# Altium PCB MOD_DRV.PcbDoc (part 1 of 2)
Units mm, origin at the board's own origin, x right, y up, seen from the top; angles counter-clockwise.
Board outline 63.5 x 51.43 mm, 2 copper layers (Top Layer, Bottom Layer); 88 components, 70 nets, 353 pads, 143 vias.
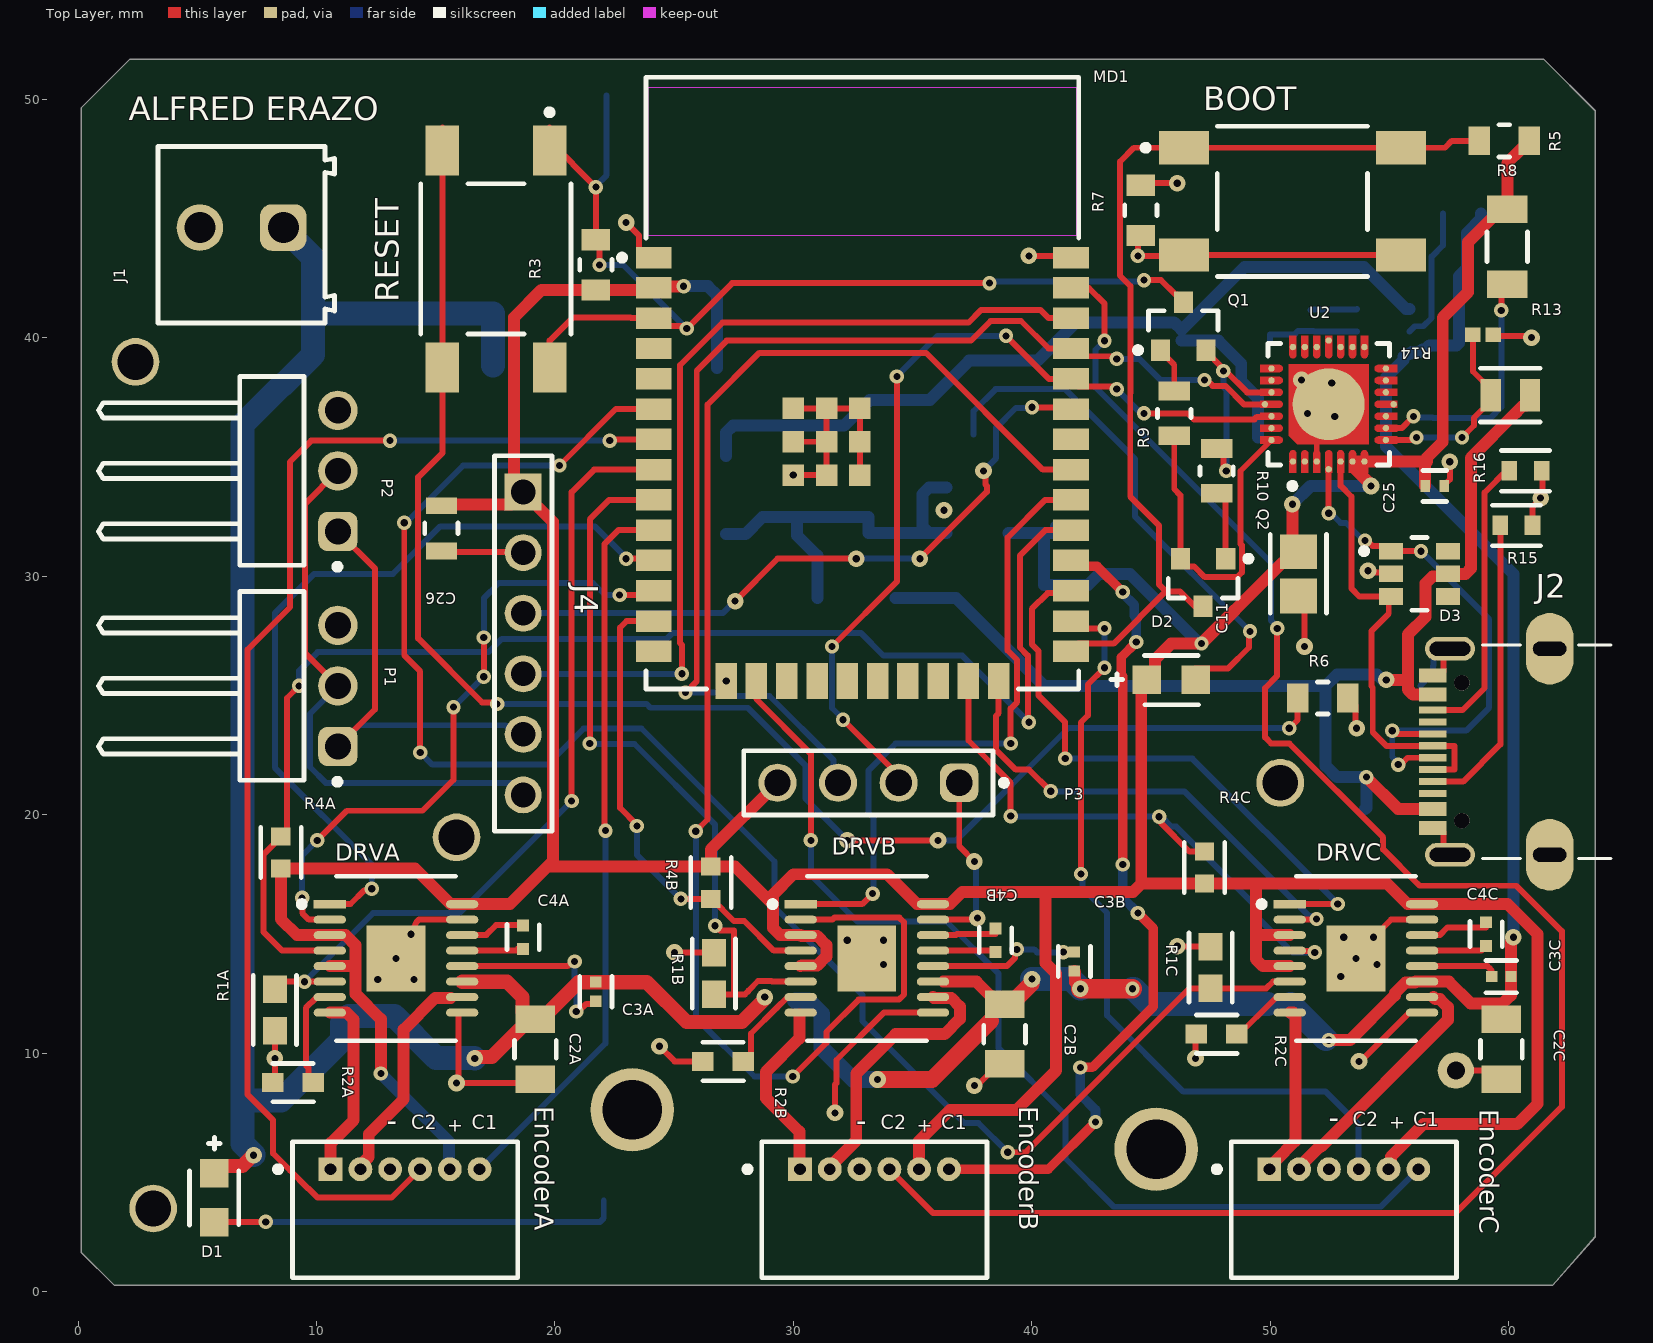
[diagram p0: Top Layer view]
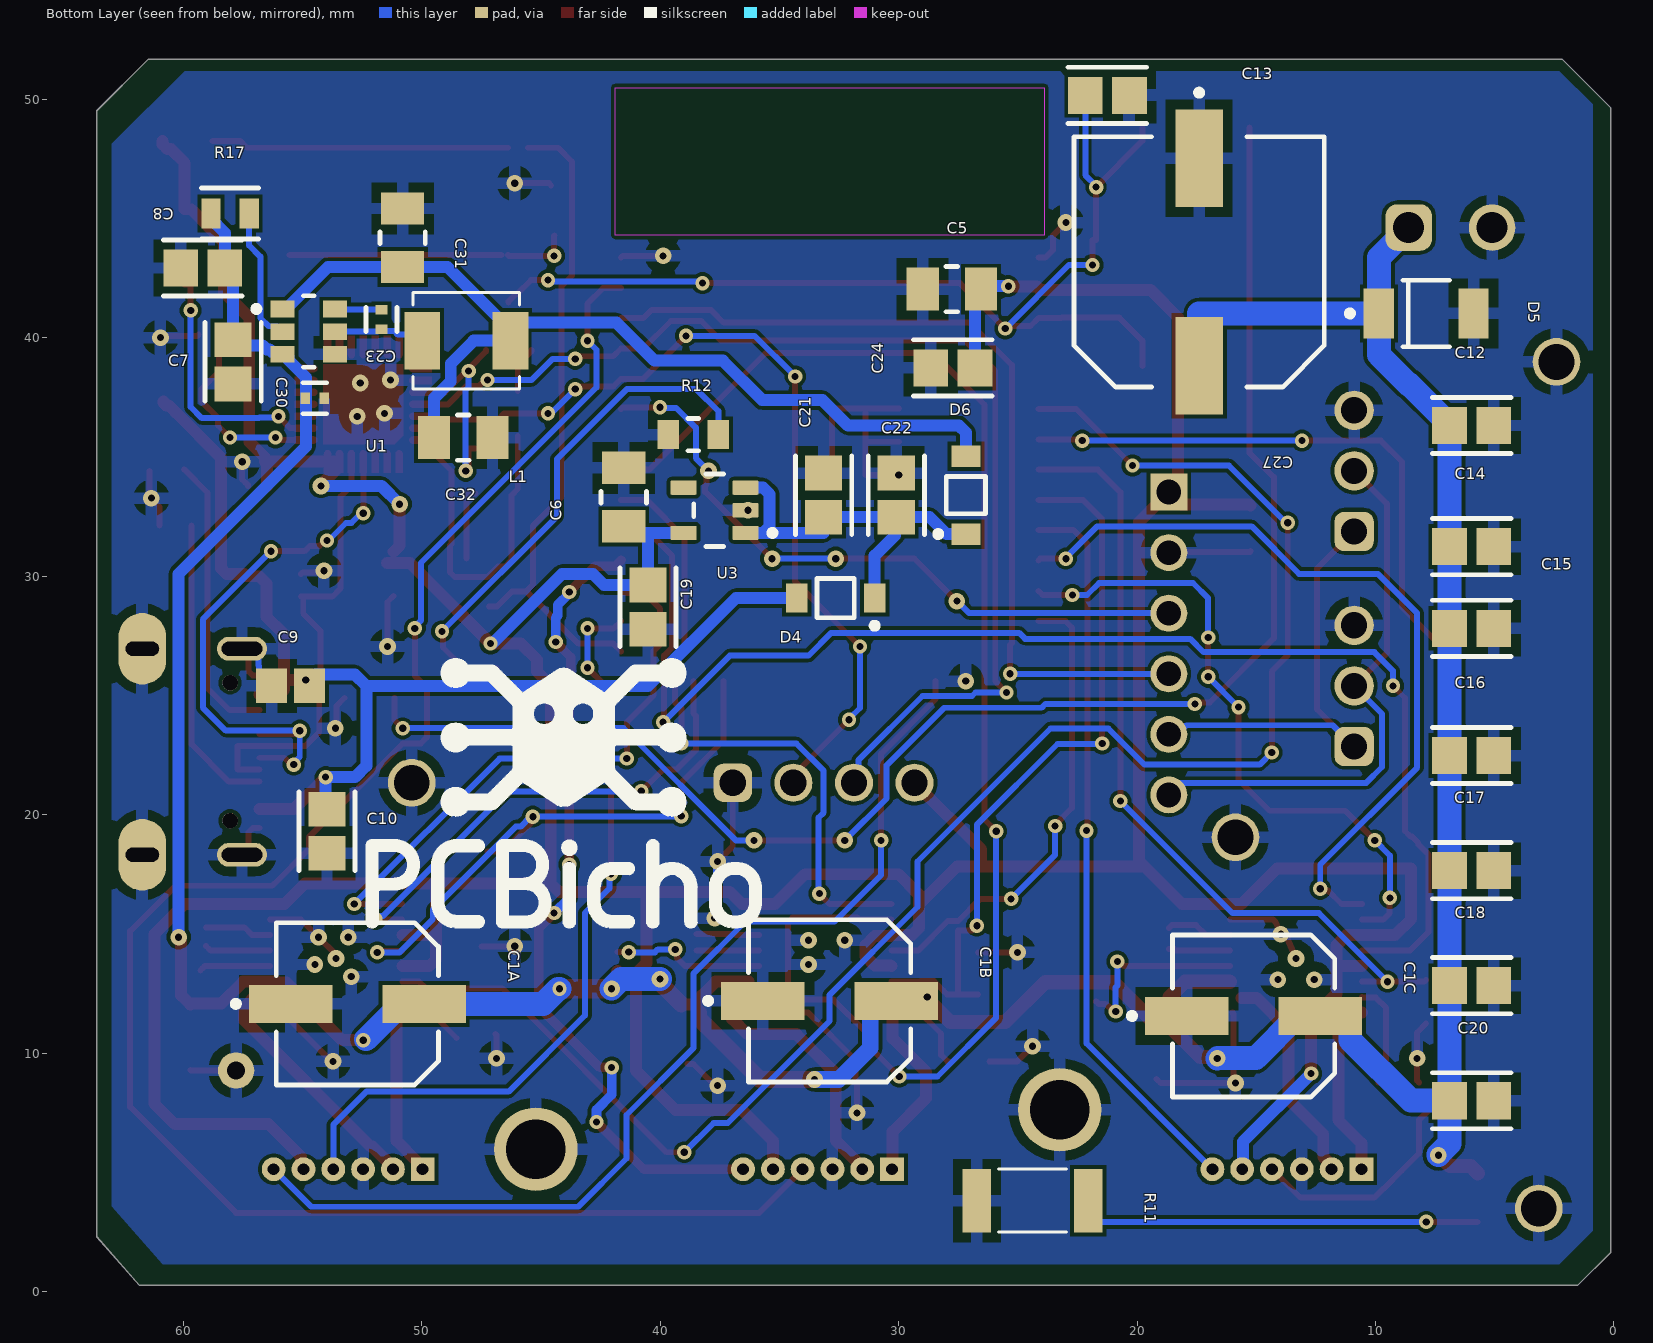
[diagram p1: Bottom Layer view, seen from below]
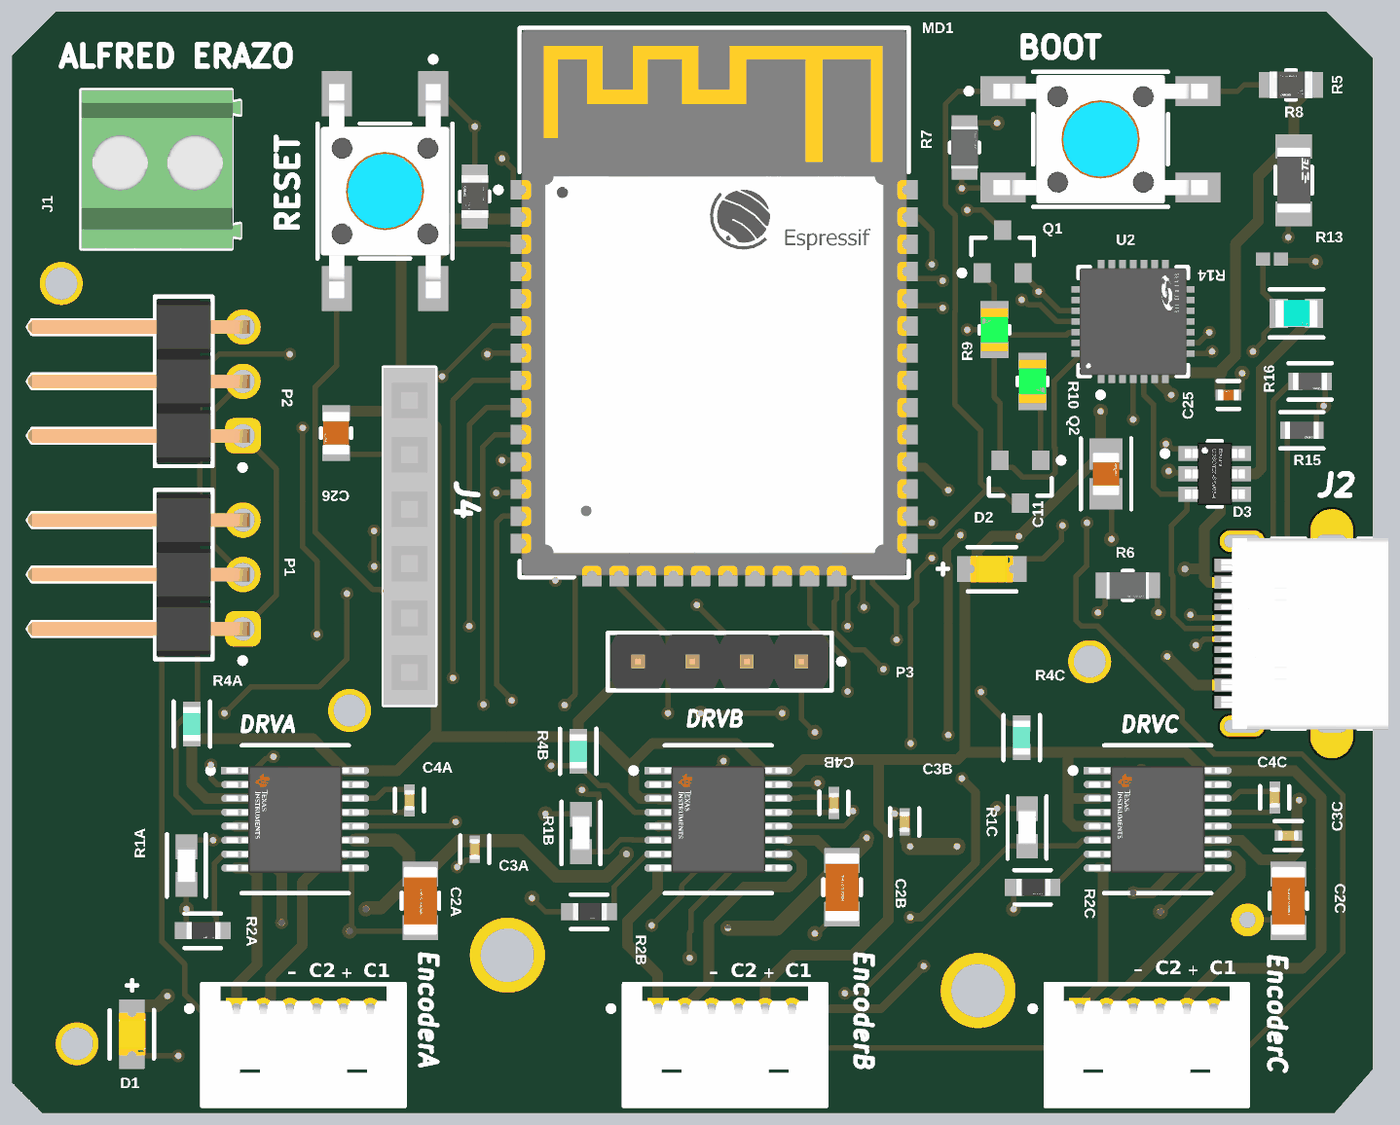
[diagram p3: 3D render of the assembled board from above, using the file's embedded part models]
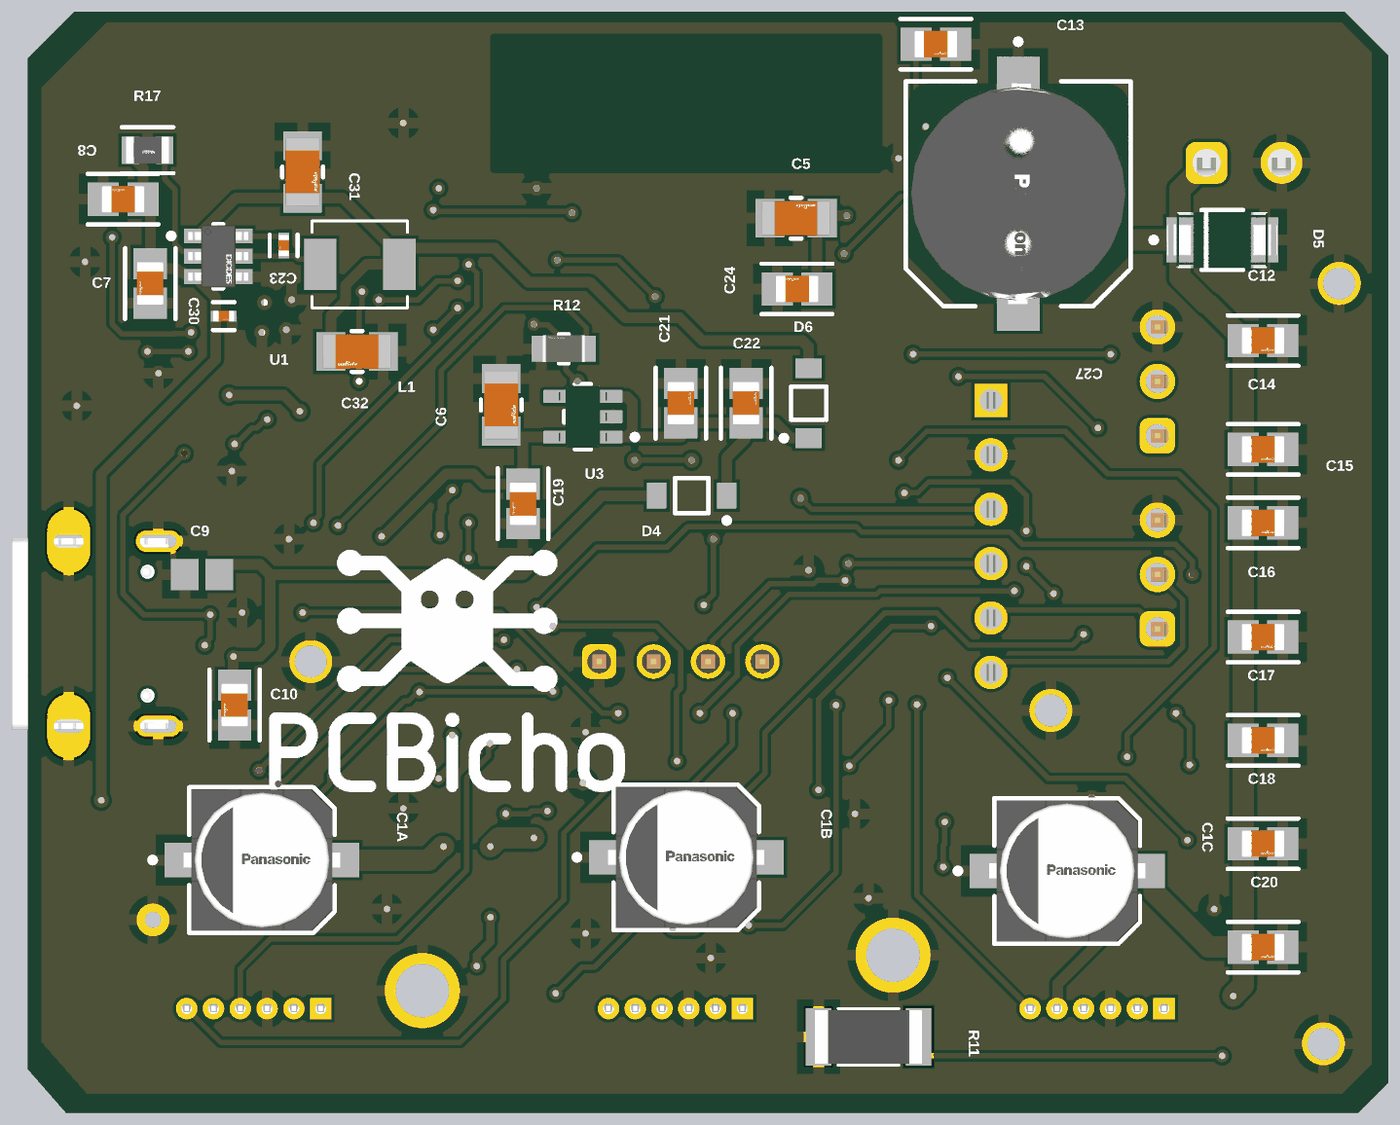
[diagram p4: 3D render of the assembled board from below, using the file's embedded part models]

## Layer stack, top to bottom
Top Solder: solder mask 0.0102, Solder Resist, Dk 3.5
Top Layer: signal copper 0.0356
Dielectric 1: dielectric 0.32, FR-4, Dk 4.8
Bottom Layer: signal copper 0.0356
Bottom Solder: solder mask 0.0102, Solder Resist, Dk 3.5

## Board outline
1.524,0.254 0.127,1.651 0.127,49.632 2.184,51.689 61.457,51.689 63.627,49.519 63.627,2.301 61.834,0.254
board region "Default Layer Stack Region": 1.524,0.254 0.127,1.651 0.127,49.632 2.184,51.689 61.457,51.689 63.627,49.519 63.627,2.301 61.834,0.254
board region "Default Layer Stack Region": 1.524,0.254 0.127,1.651 0.127,49.632 2.184,51.689 61.457,51.689 63.627,49.519 63.627,2.301 61.834,0.254
board region "Layer Stack Region 1": 1.524,0.254 0.127,1.651 0.127,49.632 2.184,51.689 61.457,51.689 63.627,49.519 63.627,2.301 61.834,0.254

## Design rules (kind name [scope] priority, off if disabled: settings)
Clearance [All] p1: gap=0.15 ignorepadtopadclearanceinfootprint=FALSE
MinimumSolderMaskSliver [All] p1: minsoldermaskwidth=0.1
PlaneConnect [All] p1: planeconnectstyle=Relief reliefexpansion=0.508 reliefentries=4 reliefconductorwidth=0.5 reliefairgap=0.254
PolygonConnect [All] p1: connectstyle=Relief reliefconductorwidth=0.5 reliefentries=4 polygonreliefangle="90 Angle" airgapwidth=0.4
RoutingVias [All] p1: holewidth=0.3 width=0.6 viastyle="Through Hole" minholewidth=0.3 minwidth=0.6 maxholewidth=0.3 maxwidth=0.6
SilkToSilkClearance [All] p1: silktosilkclearance=0.15
SilkToSolderMaskClearance [IsPad] p1: minsilkscreentomaskgap=0.1 clearancetoexposedcopper=TRUE
SolderMaskExpansion SolderMask_Vias [IsVia] p1: expansion=0 istentingtop=TRUE
SolderMaskExpansion [All] p2: expansion=0 istentingtop=FALSE
SupplyNets "Schematic Supply Nets_4" [InNet('3V3')] p1: voltage=0.000
SupplyNets "Schematic Supply Nets_3" [InNet('VBUS')] p2: voltage=0.000
SupplyNets "Schematic Supply Nets_2" [InNet('+5')] p3: voltage=0.000
SupplyNets "Schematic Supply Nets_1" [InNet('V_MOT')] p4: voltage=0.000
SupplyNets "Schematic Supply Nets" [InNet('GND')] p5: voltage=0.000
Width Width_VMOT [InNetClass('VMOT')] p1: maxlimit=3 minlimit=0.4 preferedwidth=2
Width Width_MOTOR [InNetClass('MOTOR')] p2: maxlimit=1 minlimit=0.5 preferedwidth=0.5
Width Width_PWR_LOG [InNetClass('PWR_LOG')] p3: maxlimit=1 minlimit=0.4 preferedwidth=0.5
Width [All] p4: maxlimit=0.5 minlimit=0.2 preferedwidth=0.25
26 further rules are at their usual default settings.

## Classes and differential pairs
net class PWR_LOG: 3V3 5V_sys +5 VBUS
net class MOTOR: NetDRVA_8 NetDRVA_10 NetDRVB_8 NetDRVB_10 NetDRVC_8 NetDRVC_10
net class VMOT: V_MOT
channel class DRV8876: DRV_1 DRV_2 DRV_3
component class U_PowerSupply: C7 C8 C12 C14 C15 C16 C17 C18 C19 C20 C21 C22 C23 C24 C27 C30 C31 C32 D2 D4 D5 D6 L1 R11 R17 U1 U3
component class U_ESP32_module: BOOT C5 C6 C9 C10 C11 C13 C25 D3 J2 MD1 P3 Q1 Q2 R3 R5 R6 R7 R8 R9 R10 R13 R14 R15 R16 RESET U2
component class U_CAN: C26 J4 P1 P2
component class DRV_3: C1C C2C C3C C4C DRVC EncoderC R1C R2C R4C
component class DRV_2: C1B C2B C3B C4B DRVB EncoderB R1B R2B R4B
component class DRV_1: C1A C2A C3A C4A DRVA EncoderA R1A R2A R4A

## Components (designator, comment, footprint, x,y, rotation, side; value= is the part's Value field where it differs from the comment)
BOOT "1977223-1" FP-1977223-1-MFG 50.927,45.72 r180 top (schematic designator SW2)
C1A "50SVPK22M" FP-OS-CON-SMT-C6-MFG 52.699,12.065 r180 bottom (schematic designator C1)
C1B "50SVPK22M" FP-OS-CON-SMT-C6-MFG 32.893,12.192 r180 bottom (schematic designator C1)
C1C "50SVPK22M" FP-OS-CON-SMT-C6-MFG 15.113,11.557 r180 bottom (schematic designator C1)
C2A "TMK316SD104KL-T" FP-1206-L_3_2_0_15-W_1_6-IPC_C 19.177,10.16 r270 top (schematic designator C2)
C2B "TMK316SD104KL-T" FP-1206-L_3_2_0_15-W_1_6-IPC_C 38.862,10.795 r270 top (schematic designator C2)
C2C "TMK316SD104KL-T" FP-1206-L_3_2_0_15-W_1_6-IPC_C 59.69,10.16 r270 top (schematic designator C2)
C3A "CC0402MRX5R7BB104" FP-CC0402-IPC_C 21.717,12.573 r270 top value="100 nF" (schematic designator C3)
C3B "CC0402MRX5R7BB104" FP-CC0402-IPC_C 41.783,13.843 r90 top value="100 nF" (schematic designator C3)
C3C "CC0402MRX5R7BB104" FP-CC0402-IPC_C 59.69,13.208 r180 top value="100 nF" (schematic designator C3)
C4A "CC0402KRX5R8BB223" FP-CC0402-MFG 18.669,14.859 r270 top value="22 nF" (schematic designator C4)
C4B "CC0402KRX5R8BB223" FP-CC0402-MFG 38.481,14.732 r270 top value="22 nF" (schematic designator C4)
C4C "CC0402KRX5R8BB223" FP-CC0402-MFG 59.055,14.986 r270 top value="22 nF" (schematic designator C4)
C5 "GRM31CR61E476ME44L" FP-GRM31C-0_3-IPC_C 27.768,42.037 r0 bottom
C6 "GRM31CR61E476ME44L" FP-GRM31C-0_3-IPC_C 41.529,33.319 r90 bottom
C7 "GRM21BZ7YA475KE15K" FP-GRM21B-0_2-e0_2_0_7-IPC_A 57.912,38.989 r270 bottom
C8 "GRM21BZ7YA475KE15K" FP-GRM21B-0_2-e0_2_0_7-IPC_A 59.182,42.926 r0 bottom
C9 "100nF" CAPC2013X145X50NL20T25 55.499,25.4 r180 bottom
C10 "GRM21BZ7YA475KE15K" FP-GRM21B-0_2-e0_2_0_7-IPC_A 53.975,19.304 r270 bottom
C11 "GRM21BZ7YA475KE15K" FP-GRM21B-0_2-e0_2_0_7-IPC_A 51.181,30.099 r90 top
C12 "GRM21BZ7YA475KE15K" FP-GRM21B-0_2-e0_2_0_7-IPC_A 5.969,36.322 r180 bottom
C13 "GRM21BZ7YA475KE15K" FP-GRM21B-0_2-e0_2_0_7-IPC_A 21.246,50.165 r180 bottom
C14 "GRM21BZ7YA475KE15K" FP-GRM21B-0_2-e0_2_0_7-IPC_A 5.969,31.242 r180 bottom
C15 "GRM21BZ7YA475KE15K" FP-GRM21B-0_2-e0_2_0_7-IPC_A 5.969,27.813 r180 bottom
C16 "GRM21BZ7YA475KE15K" FP-GRM21B-0_2-e0_2_0_7-IPC_A 5.969,22.479 r180 bottom
C17 "GRM21BZ7YA475KE15K" FP-GRM21B-0_2-e0_2_0_7-IPC_A 5.969,17.653 r180 bottom
C18 "GRM21BZ7YA475KE15K" FP-GRM21B-0_2-e0_2_0_7-IPC_A 5.969,12.827 r180 bottom
C19 "GRM21BZ7YA475KE15K" FP-GRM21B-0_2-e0_2_0_7-IPC_A 40.513,28.702 r270 bottom
C20 "GRM21BZ7YA475KE15K" FP-GRM21B-0_2-e0_2_0_7-IPC_A 5.969,8.001 r180 bottom
C21 "GRM21BZ7YA475KE15K" FP-GRM21B-0_2-e0_2_0_7-IPC_A 33.147,33.401 r90 bottom
C22 "GRM21BZ7YA475KE15K" FP-GRM21B-0_2-e0_2_0_7-IPC_A 30.099,33.401 r90 bottom
C23 "GRM155R71H104KE14D" FP-GRM155-0_05-MFG 51.689,40.767 r270 bottom
C24 "GRM21BZ7YA475KE15K" FP-GRM21B-0_2-e0_2_0_7-IPC_A 27.723,38.735 r0 bottom
C25 "GRM155R71H104KE14D" FP-GRM155-0_05-MFG 56.896,33.782 r180 top
C26 "GCD21BR72A104MA01L" FP-GCD21B-0_15-MFG 15.24,32.004 r270 top
C27 "EEH-ZA1V221P" FP-ZAG-MFG 17.399,43.18 r270 bottom value=220uF
C30 "GRM155R71H104KE14D" FP-GRM155-0_05-MFG 54.483,37.465 r180 bottom
C31 "GRM31CR61E476ME44L" FP-GRM31C-0_3-IPC_C 50.8,44.196 r90 bottom
C32 "GRM31CR61E476ME44L" FP-GRM31C-0_3-IPC_C 48.26,35.814 r180 bottom
D1 "SM0805YCL" FP-SM0805YCL-MFG 5.715,3.937 r270 top
D2 "SM0805YCL" FP-SM0805YCL-MFG 45.847,25.654 r0 top
D3 "CDSOT23-SRV05-4" FP-CDSOT23-SRV05-4-MFG 56.261,30.099 r0 top
D4 "MBR120VLSFT1G" ONSC-SOD-123FL-2-498-01_V 32.639,29.083 r0 bottom
D5 "SMAJ15A" FP-SMA-MFG 7.874,41.021 r180 bottom
D6 "MBR120VLSFT1G" ONSC-SOD-123FL-2-498-01_V 27.178,33.401 r90 bottom
DRVA "DRV8876PWPR" FP-PWP0016C-IPC_C 13.335,13.97 r0 top (schematic designator DRV)
DRVB "DRV8876PWPR" FP-PWP0016C-IPC_C 33.084,13.97 r0 top (schematic designator DRV)
DRVC "DRV8876PWPR" FP-PWP0016C-IPC_C 53.594,13.97 r0 top (schematic designator DRV)
EncoderA "53048-0610" FP-53048-0610-MFG 13.716,3.429 r0 top (schematic designator J3)
EncoderB "53048-0610" FP-53048-0610-MFG 33.401,3.429 r0 top (schematic designator J3)
EncoderC "53048-0610" FP-53048-0610-MFG 53.086,3.429 r0 top (schematic designator J3)
J1 "691214110002" 691214110002 6.858,44.323 r180 top
J2 "UJ20-C-H-G-SMT-2A-P16-TR" SAMESKY_UJ20-C-H-G-SMT-2A-P16-TR 61.719,22.637 r90 top
J4 "SSW-106-02-T-S" SMTC-SSW-106-02-X-S 18.669,33.528 r270 top
L1 "SRP4020TA4R7M" IND_SRP4020TA4R7M 48.133,39.878 r180 bottom value=4.7uH
MD1 "356-ESP32WRM32E132PH" FP-ESP32-WROOM-32E_4MB-MFG 32.893,38.1 r0 top
P1 "61300311021" 61300311021 8.128,25.4 r270 top
P2 "61300311021" 61300311021 8.128,34.417 r270 top
P3 "61300411121" 61300411121 33.147,21.336 r180 top
Q1 "MMBTH10LT3G" ONSC-SOT-23-3-318-08_V 46.355,40.481 r90 top
Q2 "MMBTH10LT3G" ONSC-SOT-23-3-318-08_V 47.183,29.734 r270 top
R1A "RN73R1JTTD3001F50" FP-RN73R1J-IPC_A 8.255,11.811 r90 top (schematic designator R1)
R1B "RN73R1JTTD3001F50" FP-RN73R1J-IPC_A 26.67,13.335 r270 top (schematic designator R1)
R1C "RN73R1JTTD3001F50" FP-RN73R1J-IPC_A 47.498,13.589 r270 top (schematic designator R1)
R2A "RT0603DRD0720KL" FP-RT0603-MFG 9.017,8.763 r0 top value=20KΩ (schematic designator R2)
R2B "RT0603DRD0720KL" FP-RT0603-MFG 27.051,9.652 r0 top value=20KΩ (schematic designator R2)
R2C "RT0603DRD0720KL" FP-RT0603-MFG 47.752,10.795 r0 top value=20KΩ (schematic designator R2)
R3 "RT0805FRD0710KL" FP-RT0805-MFG 21.717,43.053 r90 top value=10KΩ
R4A "RK73H1JLTDD1002F" FP-RK73H1J-IPC_C 8.509,18.415 r90 top (schematic designator R4)
R4B "RK73H1JLTDD1002F" FP-RK73H1J-IPC_C 26.543,17.145 r270 top (schematic designator R4)
R4C "RK73H1JLTDD1002F" FP-RK73H1J-IPC_C 47.244,17.78 r90 top (schematic designator R4)
R5 "RT0805FRD0710KL" FP-RT0805-MFG 59.817,48.26 r180 top value=10KΩ
R6 "AC0805FR-07470RL" FP-AC0805-MFG 52.197,24.892 r0 top value=470Ω
R7 "AC0805FR-07470RL" FP-AC0805-MFG 44.577,45.339 r90 top value=470Ω
R8 "RP73D2B1K0BTDF" FP-RP732B-MFG 59.944,43.815 r90 top value=1.0KΩ
R9 "PATT0805E1002BGT1" FP-PATT0805-MFG 45.974,36.83 r90 top value=10kΩ
R10 "PATT0805E1002BGT1" FP-PATT0805-MFG 47.752,34.417 r270 top value=10kΩ
R11 "CRCW20101K60FKEF" RESC5025X70N 24.384,3.81 r180 bottom
R12 "AC0805FR-07470RL" FP-AC0805-MFG 38.608,35.941 r0 bottom value=470Ω
R13 "RN732ATTDK2212B25" FP-RN732A-IPC_C 60.071,37.592 r0 top
R14 "47.5K" RESC1005X40X25NL10T10 58.928,40.132 r180 top
R15 "AC0603JR-075K1L" FP-AC0603-IPC_C 60.325,32.131 r0 top
R16 "AC0603JR-075K1L" FP-AC0603-IPC_C 60.706,34.417 r0 top
R17 "RC0805FR-07100KL" FP-RC0805-0_6-IPC_C 58.039,45.212 r0 bottom
RESET "1977223-1" FP-1977223-1-MFG 17.526,43.307 r90 top (schematic designator SW1)
U1 "AP63205WU-7" FP-TSOT26-MFG 54.737,40.259 r180 bottom
U2 "CP2102N-A02-GQFN28R" FP-CP2102N-A02-GQFN28R-MFG 52.451,37.211 r90 top
U3 "TLV75733PDBVR" FP-DBV0005A-MFG 37.719,32.766 r0 bottom

## Footprints (in the part's own frame and the unit in brackets; to place one, negate y for a bottom-side part, rotate by r counter-clockwise, add the part's x,y. Pads: shape width x height; smd on the part's side, far side on the other; paste and mask are expansions set on the pad)
61300311021 [mm] "Pin Header, pitch 2.54 mm, THT, Angled, single row, 3p"
  rrect50% 1.65x1.65 hole 1.1: 1(2.54,2.77)
  round 1.65 hole 1.1: 2(0,2.77) 3(-2.54,2.77)
  silkscreen extent -3.96,-7.27 4.14,2.88, body extent -3.81,-7.27 3.81,3.09, height 2.58
61300411121 [mm] "Pin Header, pitch 2.54 mm, THT, Vertical, single row, 4p"
  rrect50% 1.6x1.6 hole 1.1: 1(-3.81,0)
  round 1.6 hole 1.1: 2(-1.27,0) 3(1.27,0) 4(3.81,0)
  silkscreen extent -5.8,-1.34 5.23,1.34, body extent -5.08,-1.27 5.08,1.27, height 8.57
691214110002 [mm] "3.50 mm Horizontal Entry Modular, 2p"
  rrect50% 1.95x1.95 hole 1.3: 1(-1.75,-0.3)
  round 1.95 hole 1.3: 2(1.75,-0.3)
  silkscreen extent -3.9,-3.7 3.5,3.7, body extent -3.95,-3.7 3.5,3.7, height 8.55
CAPC2013X145X50NL20T25 [mm] "Chip Capacitor, 2-Leads, Body 2.00x1.25mm, IPC Medium Density"
  rect 1.3x1.45 smd: 1(-0.8,0) 2(0.8,0)
  body extent -1.1,-0.72 1.1,0.72, height 1.45
FP-1206-L_3_2_0_15-W_1_6-IPC_C [mm]
  rect 1.155x1.658 smd paste+0 mask+0: 1(-1.251,0) 2(1.251,0)
  silkscreen extent -0.37,-0.87 0.37,0.87, body extent -1.93,-0.97 1.93,0.97, height 0.25
FP-53048-0610-MFG [mm]
  rect 1x1 hole 0.5 paste-2539.97 mask+0: 1(-3.125,1.7)
  round 1 hole 0.5 paste-2539.97 mask+0: 2(-1.875,1.7) 3(-0.625,1.7) 4(0.625,1.7) 5(1.875,1.7) 6(3.125,1.7)
  silkscreen extent -5.45,-2.85 4.73,2.85, body extent -4.82,-2.95 4.82,2.95, height 0.25
FP-1977223-1-MFG [mm]
  rect 2.1x1.4 smd paste+0 mask+0: 1(4.55,-2.25) 2(-4.55,-2.25) 3(4.55,2.25) 4(-4.55,2.25)
  silkscreen extent -3.15,-3.15 6.27,3.15, body extent -5.7,-3.25 5.7,3.25, height 0.25
FP-AC0603-IPC_C [mm]
  rect 0.659x0.812 smd paste+0 mask+0: 1(-0.677,0) 2(0.677,0)
  silkscreen extent -1.01,-0.85 1.01,0.85, body extent -1.11,-0.55 1.11,0.55, height 0.25
FP-AC0805-MFG [mm]
  rect 0.9x1.2 smd paste+0 mask+0: 1(-1.05,0) 2(1.05,0)
  silkscreen extent -0.22,-0.67 0.22,0.67, body extent -1.6,-0.77 1.6,0.77, height 0.25
FP-CC0402-IPC_C [mm]
  rect 0.468x0.472 smd paste+0 mask+0: 1(-0.402,0) 2(0.402,0)
  silkscreen extent -0.64,-0.67 0.64,0.67, body extent -0.74,-0.38 0.74,0.38, height 0.25
FP-CC0402-MFG [mm]
  rect 0.5x0.5 smd paste+0 mask+0: 1(-0.5,0) 2(0.5,0)
  silkscreen extent -0.53,-0.68 0.53,0.67, body extent -0.87,-0.48 0.87,0.48, height 0.25
FP-CDSOT23-SRV05-4-MFG [mm]
  rect 1x0.7 smd paste+0 mask+0: 1(-1.2,0.95) 2(-1.2,0) 3(-1.2,-0.95) 4(1.2,-0.95) 5(1.2,0) 6(1.2,0.95)
  silkscreen extent -2.45,-1.53 0.33,1.53, body extent -1.8,-1.63 1.8,1.63, height 0.25
FP-CP2102N-A02-GQFN28R-MFG [mm]
  round 0.27 smd paste+0 mask+0: 1(-2.4,1.5) 2(-2.4,1) 3(-2.4,0.5) 4(-2.725,0) 5(-2.4,-0.5) 6(-2.4,-1) 7(-2.4,-1.5) 8(-1.5,-2.4) 9(-1,-2.4) 10(-0.5,-2.4) 11(0,-2.725) 12(0.5,-2.4) 13(1,-2.4) 14(1.5,-2.4) 15(2.4,-1.5) 16(2.4,-1) 17(2.4,-0.5) 18(2.675,0) 19(2.4,0.5) 20(2.4,1) 21(2.4,1.5) 22(1.5,2.4) 23(1,2.4) 24(0.5,2.4) 25(0,2.675) 26(-0.5,2.4) 27(-1,2.4) 28(-1.5,2.4)
  round 3.015 smd paste-1000 mask+0: 29(0,0)
  Top Layer region: -2.875,0.65 -2.075,0.65 -2.018,0.639 -1.969,0.606 -1.936,0.557 -1.925,0.5 -1.925,0.5 -1.936,0.443 -1.969,0.394 -2.018,0.361 -2.075,0.35 -2.075,0.35 -2.875,0.35
  Top Layer region: -1.65,-2.875 -1.65,-2.075 -1.639,-2.018 -1.606,-1.969 -1.557,-1.936 -1.5,-1.925 -1.5,-1.925 -1.443,-1.936 -1.394,-1.969 -1.361,-2.018 -1.35,-2.075 -1.35,-2.075 -1.35,-2.875
  Top Layer region: -1.35,2.875 -1.35,2.075 -1.361,2.018 -1.394,1.969 -1.443,1.936 -1.5,1.925 -1.5,1.925 -1.557,1.936 -1.606,1.969 -1.639,2.018 -1.65,2.075 -1.65,2.075 -1.65,2.875
  Top Layer region: -0.85,2.875 -0.85,2.075 -0.861,2.018 -0.894,1.969 -0.943,1.936 -1,1.925 -1,1.925 -1.057,1.936 -1.106,1.969 -1.139,2.018 -1.15,2.075 -1.15,2.075 -1.15,2.875
  Top Layer region: -0.35,2.875 -0.35,2.075 -0.361,2.018 -0.394,1.969 -0.443,1.936 -0.5,1.925 -0.5,1.925 -0.557,1.936 -0.606,1.969 -0.639,2.018 -0.65,2.075 -0.65,2.075 -0.65,2.875
  Top Layer region: 0.15,2.875 0.15,2.075 0.139,2.018 0.106,1.969 0.057,1.936 0,1.925 0,1.925 -0.057,1.936 -0.106,1.969 -0.139,2.018 -0.15,2.075 -0.15,2.075 -0.15,2.875
  Top Layer region: 0.65,2.875 0.65,2.075 0.639,2.018 0.606,1.969 0.557,1.936 0.5,1.925 0.5,1.925 0.443,1.936 0.394,1.969 0.361,2.018 0.35,2.075 0.35,2.075 0.35,2.875
  Top Layer region: 1.15,2.875 1.15,2.075 1.139,2.018 1.106,1.969 1.057,1.936 1,1.925 1,1.925 0.943,1.936 0.894,1.969 0.861,2.018 0.85,2.075 0.85,2.075 0.85,2.875
  Top Layer region: 1.65,2.875 1.65,2.075 1.639,2.018 1.606,1.969 1.557,1.936 1.5,1.925 1.5,1.925 1.443,1.936 1.394,1.969 1.361,2.018 1.35,2.075 1.35,2.075 1.35,2.875
  Top Layer region: 2.875,1.35 2.075,1.35 2.018,1.361 1.969,1.394 1.936,1.443 1.925,1.5 1.925,1.5 1.936,1.557 1.969,1.606 2.018,1.639 2.075,1.65 2.075,1.65 2.875,1.65
  Top Layer region: 2.875,0.85 2.075,0.85 2.018,0.861 1.969,0.894 1.936,0.943 1.925,1 1.925,1 1.936,1.057 1.969,1.106 2.018,1.139 2.075,1.15 2.075,1.15 2.875,1.15
  Top Layer region: 2.875,0.35 2.075,0.35 2.018,0.361 1.969,0.394 1.936,0.443 1.925,0.5 1.925,0.5 1.936,0.557 1.969,0.606 2.018,0.639 2.075,0.65 2.075,0.65 2.875,0.65
  Top Layer region: 2.875,-0.15 2.075,-0.15 2.018,-0.139 1.969,-0.106 1.936,-0.057 1.925,0 1.925,0 1.936,0.057 1.969,0.106 2.018,0.139 2.075,0.15 2.075,0.15 2.875,0.15
  Top Layer region: 2.875,-0.65 2.075,-0.65 2.018,-0.639 1.969,-0.606 1.936,-0.557 1.925,-0.5 1.925,-0.5 1.936,-0.443 1.969,-0.394 2.018,-0.361 2.075,-0.35 2.075,-0.35 2.875,-0.35
  Top Layer region: 2.875,-1.15 2.075,-1.15 2.018,-1.139 1.969,-1.106 1.936,-1.057 1.925,-1 1.925,-1 1.936,-0.943 1.969,-0.894 2.018,-0.861 2.075,-0.85 2.075,-0.85 2.875,-0.85
  Top Layer region: 2.875,-1.65 2.075,-1.65 2.018,-1.639 1.969,-1.606 1.936,-1.557 1.925,-1.5 1.925,-1.5 1.936,-1.443 1.969,-1.394 2.018,-1.361 2.075,-1.35 2.075,-1.35 2.875,-1.35
  Top Layer region: 1.35,-2.875 1.35,-2.075 1.361,-2.018 1.394,-1.969 1.443,-1.936 1.5,-1.925 1.5,-1.925 1.557,-1.936 1.606,-1.969 1.639,-2.018 1.65,-2.075 1.65,-2.075 1.65,-2.875
  Top Layer region: 0.85,-2.875 0.85,-2.075 0.861,-2.018 0.894,-1.969 0.943,-1.936 1,-1.925 1,-1.925 1.057,-1.936 1.106,-1.969 1.139,-2.018 1.15,-2.075 1.15,-2.075 1.15,-2.875
  Top Layer region: 0.35,-2.875 0.35,-2.075 0.361,-2.018 0.394,-1.969 0.443,-1.936 0.5,-1.925 0.5,-1.925 0.557,-1.936 0.606,-1.969 0.639,-2.018 0.65,-2.075 0.65,-2.075 0.65,-2.875
  Top Layer region: -0.15,-2.875 -0.15,-2.075 -0.139,-2.018 -0.106,-1.969 -0.057,-1.936 0,-1.925 0,-1.925 0.057,-1.936 0.106,-1.969 0.139,-2.018 0.15,-2.075 0.15,-2.075 0.15,-2.875
  Top Layer region: -0.65,-2.875 -0.65,-2.075 -0.639,-2.018 -0.606,-1.969 -0.557,-1.936 -0.5,-1.925 -0.5,-1.925 -0.443,-1.936 -0.394,-1.969 -0.361,-2.018 -0.35,-2.075 -0.35,-2.075 -0.35,-2.875
  Top Layer region: -1.15,-2.875 -1.15,-2.075 -1.139,-2.018 -1.106,-1.969 -1.057,-1.936 -1,-1.925 -1,-1.925 -0.943,-1.936 -0.894,-1.969 -0.861,-2.018 -0.85,-2.075 -0.85,-2.075 -0.85,-2.875
  Top Layer region: -2.875,-1.35 -2.075,-1.35 -2.018,-1.361 -1.969,-1.394 -1.936,-1.443 -1.925,-1.5 -1.925,-1.5 -1.936,-1.557 -1.969,-1.606 -2.018,-1.639 -2.075,-1.65 -2.075,-1.65 -2.875,-1.65
  Top Layer region: -2.875,-0.85 -2.075,-0.85 -2.018,-0.861 -1.969,-0.894 -1.936,-0.943 -1.925,-1 -1.925,-1 -1.936,-1.057 -1.969,-1.106 -2.018,-1.139 -2.075,-1.15 -2.075,-1.15 -2.875,-1.15
  Top Layer region: -2.875,1.15 -2.075,1.15 -2.018,1.139 -1.969,1.106 -1.936,1.057 -1.925,1 -1.925,1 -1.936,0.943 -1.969,0.894 -2.018,0.861 -2.075,0.85 -2.075,0.85 -2.875,0.85
  Top Layer region: -2.875,1.65 -2.075,1.65 -2.018,1.639 -1.969,1.606 -1.936,1.557 -1.925,1.5 -1.925,1.5 -1.936,1.443 -1.969,1.394 -2.018,1.361 -2.075,1.35 -2.075,1.35 -2.875,1.35
  Top Layer region: -2.875,0.15 -2.075,0.15 -2.018,0.139 -1.969,0.106 -1.936,0.057 -1.925,0 -1.925,0 -1.936,-0.057 -1.969,-0.106 -2.018,-0.139 -2.075,-0.15 -2.075,-0.15 -2.875,-0.15
  Top Layer region: -2.875,-0.35 -2.075,-0.35 -2.018,-0.361 -1.969,-0.394 -1.936,-0.443 -1.925,-0.5 -1.925,-0.5 -1.936,-0.557 -1.969,-0.606 -2.018,-0.639 -2.075,-0.65 -2.075,-0.65 -2.875,-0.65
  Top Layer region: -1.325,1.675 1.675,1.675 1.675,-1.675 -1.675,-1.675 -1.675,1.325 -1.325,1.675
  silkscreen extent -3.55,-2.55 2.55,2.55, body extent -2.98,-2.98 2.98,2.98, height 0.25
FP-DBV0005A-MFG [mm]
  rrect17% 1.1x0.6 smd paste+0 mask+0: 1(-1.3,0.95) 2(-1.3,0) 3(-1.3,-0.95) 4(1.3,-0.95) 5(1.3,0.95)
  silkscreen extent -2.55,-1.53 0.87,1.53, body extent -1.4,-1.45 1.4,1.45, height 1.45
FP-ESP32-WROOM-32E_4MB-MFG [mm]
  rect 1.5x0.9 smd paste+0 mask+0: 1(-8.75,5.26) 2(-8.75,3.99) 3(-8.75,2.72) 4(-8.75,1.45) 5(-8.75,0.18) 6(-8.75,-1.09) 7(-8.75,-2.36) 8(-8.75,-3.63) 9(-8.75,-4.9) 10(-8.75,-6.17) 11(-8.75,-7.44) 12(-8.75,-8.71) 13(-8.75,-9.98) 14(-8.75,-11.25) 25(8.75,-11.25) 26(8.75,-9.98) 27(8.75,-8.71) 28(8.75,-7.44) 29(8.75,-6.17) 30(8.75,-4.9) 31(8.75,-3.63) 32(8.75,-2.36) 33(8.75,-1.09) 34(8.75,0.18) 35(8.75,1.45) 36(8.75,2.72) 37(8.75,3.99) 38(8.75,5.26)
  rect 0.9x1.5 smd paste+0 mask+0: 15(-5.71,-12.5) 16(-4.44,-12.5) 17(-3.17,-12.5) 18(-1.9,-12.5) 19(-0.63,-12.5) 20(0.64,-12.5) 21(1.91,-12.5) 22(3.18,-12.5) 23(4.45,-12.5) 24(5.72,-12.5)
  rect 0.9x0.9 smd paste+0 mask+0: 39(-2.9,-3.86) 39(-2.9,-2.46) 39(-2.9,-1.06) 39(-1.5,-3.86) 39(-1.5,-2.46) 39(-1.5,-1.06) 39(-0.1,-3.86) 39(-0.1,-2.46) 39(-0.1,-1.06)
  Keep-Out Layer region: -9,6.205 9,6.205 9,12.395 -9,12.395
  Keep-Out Layer region: -9,6.205 9,6.205 9,12.395 -9,12.395
  silkscreen extent -10.2,-12.83 9.08,12.83, body extent -9.6,-13.35 9.6,12.93, height 0.25
FP-GCD21B-0_15-MFG [mm]
  rect 0.7x1.3 smd paste+0 mask+0: 1(-0.95,0) 2(0.95,0)
  silkscreen extent -0.22,-0.7 0.22,0.7, body extent -1.4,-0.8 1.4,0.8, height 0.25
FP-GRM21B-0_2-e0_2_0_7-IPC_A [mm]
  rect 1.455x1.556 smd paste+0 mask+0: 1(-0.926,0) 2(0.926,0)
  silkscreen extent -1.65,-1.18 1.65,1.18, body extent -1,-0.63 1,0.63, height 1.45
FP-GRM31C-0_3-IPC_C [mm]
  rect 1.353x1.804 smd paste+0 mask+0: 1(-1.225,0) 2(1.225,0)
  silkscreen extent -0.25,-0.95 0.25,0.95, body extent -1.6,-0.8 1.6,0.8, height 1.9
FP-GRM155-0_05-MFG [mm]
  rect 0.4x0.5 smd paste+0 mask+0: 1(-0.4,0) 2(0.4,0)
  silkscreen extent -0.5,-0.65 0.5,0.65, body extent -0.5,-0.25 0.5,0.25, height 0.55
FP-OS-CON-SMT-C6-MFG [mm]
  rect 3.5x1.6 smd paste+0 mask+0: 1(-2.8,0) 2(2.8,0)
  silkscreen extent -5.23,-3.4 3.4,3.4, body extent -3.65,-3.3 3.65,3.3, height 6
FP-PATT0805-MFG [mil]
  rect 31x52 smd paste+0 mask+0: 1(-37,0) 2(37,0)
  silkscreen extent -7,-28 7,28, body extent -56,-31 56,31, height 10
FP-PWP0016C-IPC_C [mm]
  rect 1.355x0.341 smd paste+0 mask+0: 1(-2.775,2.275)
  rrect100% 1.355x0.341 smd paste+0 mask+0: 2(-2.775,1.625) 3(-2.775,0.975) 4(-2.775,0.325) 5(-2.775,-0.325) 6(-2.775,-0.975) 7(-2.775,-1.625) 8(-2.775,-2.275) 9(2.775,-2.275) 10(2.775,-1.625) 11(2.775,-0.975) 12(2.775,-0.325) 13(2.775,0.325) 14(2.775,0.975) 15(2.775,1.625) 16(2.775,2.275)
  rect 2.46x2.77 smd paste-1000 mask+0: 17(0,0)
  silkscreen extent -4.08,-3.45 2.5,3.45, body extent -3.55,-2.6 3.55,2.6, height 0.25
FP-RC0805-0_6-IPC_C [mm]
  rect 0.808x1.262 smd paste+0 mask+0: 1(-0.802,0) 2(0.802,0)
  silkscreen extent -1.21,-1.07 1.21,1.07, body extent -1,-0.63 1,0.63, height 0.6
FP-RK73H1J-IPC_C [mm]
  rect 0.756x0.812 smd paste+0 mask+0: 1(-0.675,0) 2(0.675,0)
  silkscreen extent -1.05,-0.85 1.05,0.85, body extent -1.15,-0.55 1.15,0.55, height 0.25
FP-RN73R1J-IPC_A [mm]
  rect 1.156x1.012 smd paste+0 mask+0: 1(-0.875,0) 2(0.875,0)
  silkscreen extent -1.45,-0.91 1.45,0.91, body extent -1.95,-1.01 1.95,1.01, height 0.25
FP-RN732A-IPC_C [mil]
  rect 33.67x53.39 smd paste+0 mask+0: 1(-32.5,0) 2(32.5,0)
  silkscreen extent -49,-44 49,44, body extent -53,-32 53,32, height 10
FP-RP732B-MFG [mm]
  rect 1.15x1.7 smd paste+0 mask+0: 1(-1.575,0) 2(1.575,0)
  silkscreen extent -0.62,-0.85 0.62,0.85, body extent -2.25,-0.95 2.25,0.95, height 0.25
FP-RT0603-MFG [mm]
  rect 0.9x0.8 smd paste+0 mask+0: 1(-0.85,0) 2(0.85,0)
  silkscreen extent -0.85,-0.81 0.86,0.8, body extent -1.4,-0.55 1.4,0.55, height 0.25
FP-RT0805-MFG [mm]
  rect 0.9x1.2 smd paste+0 mask+0: 1(-1.05,0) 2(1.05,0)
  silkscreen extent -0.22,-0.67 0.22,0.67, body extent -1.6,-0.77 1.6,0.77, height 0.25
FP-SM0805YCL-MFG [mil]
  rect 47x47 smd paste+0 mask+0: 1(-40.5,0) 2(40.5,0)
  silkscreen extent -100,-41 45,40, body extent -68,-33 68,33, height 10
FP-SMA-MFG [mm]
  rect 1.27x2.1 smd paste+0 mask+0: 1(-1.985,0) 2(1.985,0)
  silkscreen extent -3.32,-1.4 0.98,1.4, body extent -2.61,-1.3 2.61,1.3, height 2.62
FP-TSOT26-MFG [mm]
  rect 1x0.7 smd paste+0 mask+0: 1(-1.1,0.95) 2(-1.1,0) 3(-1.1,-0.95) 4(1.1,-0.95) 5(1.1,0) 6(1.1,0.95)
  silkscreen extent -2.33,-1.5 0.22,1.5, body extent -1.4,-1.45 1.4,1.45, height 1
FP-ZAG-MFG [mm]
  rect 4.1x2 smd paste+0 mask+0: 1(-4.35,0) 2(4.35,0)
  silkscreen extent -7.22,-5.25 5.25,5.25, body extent -6.03,-5.16 5.85,5.16, height 10.51
IND_SRP4020TA4R7M [mm]
  rect 1.5x2.4 smd: 1(-1.85,0) 2(1.85,0)
  silkscreen extent -2.22,-2.03 2.22,2.03
ONSC-SOD-123FL-2-498-01_V [mm] "SOD, 2-Leads, Body 2.7x1.65mm"
  rect 0.91x1.22 smd: 1(-1.635,0) 2(1.635,0)
  silkscreen extent -1.76,-0.82 0.78,1.28, body extent -1.35,-0.82 1.35,0.82, height 1
ONSC-SOT-23-3-318-08_V [mm] "SOT23, 3-Leads, Body 2.92x1.3mm, Pitch 0.95mm"
  rect 0.9x0.8 smd: 1(-1,0.95) 2(-1,-0.95) 3(1,0)
  silkscreen extent -1.12,-1.46 0.65,2.02, body extent -0.65,-1.46 0.65,1.46, height 1.11
RESC1005X40X25NL10T10 [mm] "Chip Resistor, 2-Leads, Body 1.00x0.50mm, IPC Medium Density"
  rect 0.65x0.6 smd: 1(-0.425,0) 2(0.425,0)
  body extent -0.55,-0.3 0.55,0.3, height 0.4
RESC5025X70N [mm]
  rect 1.2x2.67 smd paste+0 mask+0.102: 1(-2.335,0) 2(2.335,0)
  silkscreen extent -1.42,-1.32 1.42,1.32, body extent -2.5,-1.25 2.5,1.25, height 0.7
SAMESKY_UJ20-C-H-G-SMT-2A-P16-TR [mm]
  rect 0.6x1.15 smd paste+0 mask+0.102: A1_B12(-3.2,4.905) A4_B9(-2.4,4.905) B1_A12(3.2,4.905) B4_A9(2.4,4.905)
  rect 0.3x1.15 smd paste+0 mask+0.102: A5(-1.25,4.905) A6(-0.25,4.905) A7(0.25,4.905) A8(1.25,4.905) B5(1.75,4.905) B6(0.75,4.905) B7(-0.75,4.905) B8(-1.75,4.905)
  oval 3x2 hole 0.6 slot 1.4 at 90 deg mask+0.102: SH1(-4.32,0) SH2(4.32,0)
  oval 1x2.1 hole 0.6 slot 1.7 at 90 deg mask+0.102: SH3(-4.32,4.18) SH4(4.32,4.18)
  round 0.65 hole 0.65 unplated mask+0: ""(-2.89,3.68) ""(2.89,3.68)
  silkscreen extent -4.47,-2.57 4.47,2.81, body extent -4.47,-2.64 4.47,5.16, height 3.19
SMTC-SSW-106-02-X-S [mm] "SQ Post Socket, 1x6 Pins, Vertical, 2.54mm Pitch, Female"
  rect 1.55x1.55 hole 1.04: 1(0,0)
  round 1.55 hole 1.04: 2(2.54,0) 3(5.08,0) 4(7.62,0) 5(10.16,0) 6(12.7,0)
  silkscreen extent -1.53,-1.2 14.23,1.2, body extent -1.52,-1.21 14.22,1.21, height 8.51

## Part data
BOOT RESET: library part CMP-03790-42203485-1, "1977223-1 Pushbutton Switch, SPST, Momentary, 0.05A, 24VDC, Solder Terminal, Panel Mount", Case/Package=SMD/SMT, Contact Current Rating=50mA, Manufacturer Lifecycle Status=ACTIVE, Max Operating Temperature=105°C, Max Voltage Rating (DC)=24V, Min Operating Temperature=-40°C, Actuator Length=700µm, Actuator Material="Nylon, Polyamide", Contact Plating=Silver, Current Rating=50mA, ELV=Compliant, Height=4.3mm, Housing Material=Polyphenylene, Illumination Type="Illuminated, Non-Illuminated", Lifecycle Status=Production, Material=Polyamide, Mechanical Life=1Mcycles, Mount="Surface Mount", NexarPartId=42203485, Number of Positions=2, Packaging=Bulk, Radiation Hardening=No, REACH SVHC="No SVHC", RoHS=Compliant, Switch Function=Off-Mom, Switch Travel=250µm, Termination="Gull Wing", Throw Configuration=SPST, Type=Switch, Voltage Rating (DC)=24V
C1A C1B C1C: library part CMP-05428-000935-1, "Conductive Polymer Aluminum Solid Capacitors (OS-CON) 22uF ±20% 50V", Capacitance=22uF, Case/Package=Radial, ESR (Equivalent Series Resistance)=35mR, Max Operating Temperature=125°C, Min Operating Temperature=-55°C, Tolerance=20%, Voltage Rating=50V, Life (Hours)=1000Hour, Mount="Surface Mount", Packaging="Cut Tape", RoHS Compliant=Yes, Series="OS-CON™, SVPK"
C2A C2B C2C: library part CMP-14477-003553-3, "Ceramic Capacitor, 1206, 0.1uF, 10%, 25V", Capacitance=100nF, Case Code (Imperial)=1206, Case Code (Metric)=3216, Dielectric Material=Ceramic, Max Operating Temperature=125°C, Min Operating Temperature=-55°C, Tolerance=10%, Voltage=25V, Case/Package=1206, Composition=Ceramic, Depth=1.6mm, Halogen Free="Halogen Free", Height=1.8mm, Lead Free="Lead Free", Length=3.2mm, Material=Ceramic, Max Length=3.35mm, Max Thickness=1.8mm, Max Width=1.75mm, Min Length=3.05mm, Min Thickness=1.4mm, Min Width=1.45mm, Mount="Surface Mount", NexarPartId=198412, Number of Pins=2, Packaging="Cut Tape", REACH SVHC=Unknown, RoHS=Compliant, Termination=SMD/SMT, Thickness=1.8034mm, Voltage Rating=25V, Voltage Rating (DC)=25V, Width=1.6mm
C3A C3B C3C: library part CMP-03422-001312-1, "CAP CER 0.1UF 16V X5R 0402", Capacitance="100 nF", Manufacturer=YAGEO, Package=CC0402, Temperature="-55°C to +125°C", Temperature Characteristic=X5R, Temperature Coefficient=30ppm/°C, Temperature Range High=+125°C, Temperature Range Low=-55°C, Tolerance=0.2, Voltage Rating="16 V", Automotive=No, Automotive Grade=NA, Category=Cap, ComponentLink2Description=Datasheet, ComponentLink2URL=http://www.yageo.com/documents/recent/UPY-GP_NP0_16V-to-50V_16.pdf, Device Class L1="Passive Components", Device Class L2=Capacitors, Device Class L3="Ceramic Capacitors", Digikey Description="CAP CER 0.1UF 16V X5R 0402", Footprint Url=http://www.yageo.com/exep/pages/download/literatures/UPY-C_GEN_24.pdf, Height=0.55mm, Ipc Land Pattern Name=CAPC10050X50, Lead Free=Yes, Manufacturer Part Number=CC0402MRX5R7BB104, Material=Ceramic, Mouser Description="Multilayer Ceramic Capacitors MLCC - SMD/SMT 100nF 16V X5R 20%", Octopart=https://octopart.com/cc0402mrx5r7bb104-yageo-33242280, RoHS=TRUE
C4A C4B C4C: library part CMP-03422-000870-1, "CC0402 22 nF X5R 10.00% 25 V", Capacitance="22 nF", Manufacturer=YAGEO, Package=CC0402, Temperature="-55°C to +125°C", Temperature Characteristic=X5R, Temperature Coefficient=30ppm/°C, Temperature Range High=+125°C, Temperature Range Low=-55°C, Tolerance=0.1, Voltage Rating="25 V", Automotive=No, Automotive Grade=NA, Category=Cap, ComponentLink2Description=Datasheet, ComponentLink2URL=http://www.yageo.com/documents/recent/UPY-GP_NP0_16V-to-50V_16.pdf, Device Class L1="Passive Components", Device Class L2=Capacitors, Device Class L3="Ceramic Capacitors", Footprint Url=http://www.yageo.com/exep/pages/download/literatures/UPY-C_GEN_24.pdf, Height=0.55mm, Ipc Land Pattern Name=CAPC10050X50, Lead Free=Yes, Manufacturer Part Number=CC0402KRX5R8BB223, Material=Ceramic, Octopart=https://octopart.com/cc0402krx5r8bb223-yageo-88496716, RoHS=TRUE
C5 C6: library part CMP-06035-000147-1, "CAP CER 47UF 25V X5R 1206-GRM31CR61E476ME44L", Capacitance=47uF, Dielectric=X5R, Tolerance=20%, Voltage Rating (DC)=25V, Length=3.2mm, Thickness=1.6mm, Width=1.6mm
C7 C8 C10 C12 C14 C15 C16 C17 C18 C19 C20 C21 C22 C24: library part CMP-06035-048385-1, "Chip Multilayer Ceramic Capacitors for General Purpose, 0805, 4.7uF, X7R, 15%, 10%, 35V. GRM21BZ7YA475KE15K"
  C7 C8 C12 C14 C15 C16 C17 C18 C19 C20 C21 C22 C24: Parameter 1=4.7uF
C9: library part CMP-2007-01227-1, "C0805S104K5RACTU", Manufacturer=Kemet, Part Number=C0805S104K5RACTU
C11: library part CMP-06035-048385-1, "Chip Multilayer Ceramic Capacitors for General Purpose, 0805, 4.7uF, X7R, 15%, 10%, 35V-GRM21BZ7YA475KE15K"
C13: library part CMP-06035-048385-1, "Chip Multilayer Ceramic Capacitors for General Purpose, 0805, 4.7uF, X7R, 15%, 10%, 35V"
C23 C25 C30: library part CMP-06035-062118-1, "Chip Multilayer Ceramic Capacitors for General Purpose, 0402, 0.10uF, X7R, 15%, 20%, 50V", Parameter 1=0.1uF, RoHS Compliant=Yes
C26: library part CMP-06035-062053-1, "Chip Multilayer Ceramic Capacitors for Automotive, 0805, 0.10uF, X7R, 15%, 20%, 100V, Grade 1"
C27: library part CMP-05428-000011-1, "HYBRID SMD 35V220UF 105DEGC 1000", Capacitance=220uF, Leakage Current=77uA, Manufacturer=Panasonic, Package=ZAG, Ripple Current=2500mA, Temperature="-55°C to +105°C", Temperature Range High=+105°C, Temperature Range Low=-55°C, Tolerance=20%, Voltage Rating=35V, Automotive=Yes, Automotive Grade="Grade 2", Category=Cap, ComponentLink2Description=Datasheet, ComponentLink2URL=https://b2b-api.panasonic.eu/file_stream/pids/fileversion/41, Device Class L1="Passive Components", Device Class L2=Capacitors, Device Class L3="Polymer Capacitors", Digikey Description="HYBRID SMD 35V220UF 105DEGC 1000", Dissipation Factor=12%, Esr=20mΩ, Footprint Url=https://b2b-api.panasonic.eu/file_stream/pids/fileversion/37, Height=10.5mm, Lead Free=Yes, Life=10000Hours, Manufacturer Part Number=EEH-ZA1V221P, Material=Polymer, Mouser Description="Capacitor Aluminum Polymer 220uF 20% 35V 2-Pin Surface Mount Paper T/R", Octopart=https://octopart.com/eeh-za1v221p-panasonic-103134281, RoHS=TRUE
C31 C32: library part CMP-06035-000147-1, "CAP CER 47UF 25V X5R 1206", Capacitance=47uF, Dielectric=X5R, Tolerance=20%, Voltage Rating (DC)=25V, Length=3.2mm, Thickness=1.6mm, Width=1.6mm
D1 D2: library part CMP-35283-000007-1, "LED YELLOW CLEAR 0805 SMD", Case Code (Imperial)=0805, Case Code (Metric)=2012, Color=Yellow, Forward Current=2mA, Forward Voltage=1.9V, Lens Color=Colorless, Max Operating Temperature=80°C, Min Operating Temperature=-30°C, Package Quantity=4000, Case/Package=0805, Dominant Wavelength=592nm, Height=0.8mm, Illumination Color=Yellow, Lead Free="Lead Free", Length=2mm, Lens Transparency=Clear, Luminous Intensity=11.5mcd, Mount="Surface Mount", Packaging="Tape and Reel", Test Current=2mA, Viewing Angle=130°, Width=1.2mm
D3: library part CMP-07401-000007-1, "TVS DIODE 5V 15V SOT23-6", Breakdown Voltage=6V, Clamping Voltage=15V, Manufacturer="Bourns Inc.", Max Junction Temp=+150°C, Peak Pulse Current=30A, Peak Pulse Power=500W, Reverse Standoff Voltage=5V, Temperature="-55°C to +150°C", Temperature Range Low=-55°C, Automotive=No, Category=Diode, ComponentLink2Description=Datasheet, ComponentLink2URL=https://www.bourns.com/docs/Product-Datasheets/CDSOT23-SRV05-4.pdf, Device Class L1="Circuit Protection", Device Class L2="TVS Diodes", Device Class L3=unset, Digikey Description="TVS DIODE 5V 15V SOT23-6", Direction=Bidirectional, Height=1.45mm, Ipc Land Pattern Name=SOT95P280X118-6, Lead Free=Yes, Manufacturer Part Number=CDSOT23-SRV05-4, Mouser Description="CDSOT23-SRV05-4, Quad Uni-Directional TVS Diode, 500W, 6-Pin SOT-23", Number Of Channels=4, Octopart=https://octopart.com/cdsot23-srv05-4-bourns-1679449, Package=CDSOT23-SRV05-4, RoHS=TRUE, Standoff Height=0.2mm, Temperature Range High=+150°C
D4 D6: library part CMP-1055-00449-1, "Schottky Power Rectifier, 2-Pin SOD-123, Pb-Free, Tape and Reel", Manufacturer="On Semiconductor", ComponentLink1Description="Manufacturer URL", ComponentLink1URL=http://www.onsemi.com/, ComponentLink2Description=Datasheet, ComponentLink2URL=http://www.onsemi.cn/pub_link/Collateral/MBR120VLSFT1-D.PDF, ComponentLink3Description="Package Specification", ComponentLink3URL=http://www.onsemi.cn/pub_link/Collateral/MBR120VLSFT1-D.PDF, Configuration=Single, DatasheetVersion="Rev. 2", IFSM Max (A)=45, Mounting Technology="Surface Mount", PackageDescription="2-Pin SOD, Body 1.65 x 2.7 mm", PackageReference=SOD-123FL-2-498-01, PackageVersion="Rev. A", Packing="Tape and Reel", PartNumber=MBR120VLSFT1G, RoHS=TRUE
D5: library part CMP-07401-000026-1, "TVS DIODE 15V 24.4V SMA", Breakdown Voltage=16.7V, Clamping Voltage=24.4V, Manufacturer="Bourns Inc.", Max Junction Temp=+150°C, Package=SMA, Peak Pulse Current=16.4A, Peak Pulse Power=400W, Reverse Standoff Voltage=15V, Temperature="-55°C to +150°C", Temperature Range Low=-55°C, Automotive=No, Category=Diode, ComponentLink2Description=Datasheet, ComponentLink2URL=https://www.bourns.com/docs/Product-Datasheets/SMAJ.pdf, Device Class L1="Circuit Protection", Device Class L2="TVS Diodes", Device Class L3=unset, Digikey Description="TVS DIODE 15V 24.4V SMA", Direction=Unidirectional, Height=2.29mm, Lead Free=Yes, Manufacturer Part Number=SMAJ15A, Mouser Description="Bourns Smaj15a / Diode Tvs 15v 400w Uni 5% Smd Bourns", Number Of Channels=1, Octopart=https://octopart.com/smaj15a-bourns-12809353, RoHS=TRUE, Temperature Range High=+150°C
DRVA DRVB DRVC: library part CMP-04915-000007-1, "PWR MGMT MOTOR/FAN DRIVER"
EncoderA EncoderB EncoderC: library part CMP-2000-05632-2, "CONN HEADER R/A 6POS 1.25MM", Color=Natural, Contact Resistance=20mR, Current Rating=1A, Flammability Rating="UL94 V-0", Insulation Resistance=100MR, Max Current Rating=3A, Max Operating Temperature=85°C, Max Voltage Rating (AC)=250V, Min Operating Temperature=-40°C, Package Quantity=2000, Voltage Rating=125V, Contact Material=Bronze, Contact Plating=Tin, Contact Type="Blade Pin", Depth=5.5mm, Gender=Male, Glow Wire Compliant=Non-compliant, Height=6.99mm, Housing Color=Natural, Housing Material=Nylon, Lead Free="Lead Free", Mount="Through Hole", Number of Circuits=6, Number of Contacts=6, Number of Positions=6, Number of Rows=1, Orientation="Right Angle", Packaging=Tray, Pitch=1.25mm, Radiation Hardening=No, RoHS Compliant=Yes, Series=PicoBlade, Termination=Solder, Voltage Rating (DC)=125V
J1: library part CMP-1502-02464-3, "2141 Series 3.5MM Pitch Straight, Pcb Terminal Block, Through Hole, 2 Way", Color="Blue, Green", Current=10A, Max Operating Temperature=105°C, Min Operating Temperature=-40°C, Voltage=300V, Contact Material=Tin, Contact Plating="Brass, Tin", Current Rating=10A, Height=8.7mm, Housing Material=Nylon, Lead Pitch=3.5mm, Length=7.4mm, Mount="Through Hole", Number of Contacts=2, Number of Levels=1, Number of Pins=2, Number of Positions Per Level=2, Number of Rows=1, Packaging=Box, Pitch=3.5052mm, Plating="Brass, Steel", RoHS=Compliant, Stripping Length=-6mm, Termination=Screw, Voltage Rating=300V, Width=7.9mm, Wire Gauge (Max)=24AWG, Wire Gauge (Min)=16AWG, Wire/Cable Gauge=24AWG
J2: Package=None, Availability=Unavailable, MP=UJ20-C-H-G-SMT-2A-P16-TR, Price=None
J4: library part CMP-1023-00360-1, "SQ Post Socket, Through-hole, Vertical, -55 to 105 degC, 2.54mm Pitch, 6-Pin, Female, RoHS", Manufacturer=Samtec, Temperature Range="-55 to 105 degC", ComponentLink1Description="Manufacturer URL", ComponentLink1URL=http://www.samtec.com, ComponentLink2Description=Datasheet, ComponentLink2URL=http://www.samtec.com/documents/webfiles/pdf/SSW_TH.PDF, ComponentLink3Description="Package Specification", ComponentLink3URL=http://www.samtec.com/documents/webfiles/cpdf/SSW-1XX-XX-XXX-X-XX-XXX-XX-MKT.pdf, DatasheetVersion=F-214, Mounting Technology=Through-hole, Orientation=Vertical, PackageDescription="Assembly, Socket Strip .016 X .031 Tail", PackageReference=SSW-106-02-X-S, PackageVersion="CA, 6/1987", PartNumber=SSW-106-02-T-S, Pitch="2.54 mm", RoHS=True
L1: "Inductor Power Shielded Wirewound 4.7uH 20% 100KHz 10Q-Factor Carbonyl Powder 2.6A 0.105Ohm DCR 1616 Automotive T/R", Package=None, Availability="In Stock", Check_prices=https://www.snapeda.com/parts/SRP4020TA4R7M/Bourns/view-part/?ref=eda, MF=Bourns, MP=SRP4020TA4R7M, Price=None, Purchase-URL=https://pricing.snapeda.com/search/part/SRP4020TA4R7M/?ref=eda, SnapEDA_Link=https://www.snapeda.com/parts/SRP4020TA4R7M/Bourns/view-part/?ref=snap
MD1: library part CMP-194065-000026-1, "RX TXRX MOD WIFI TRACE ANT SMD"
P1 P2: library part CMP-1502-01061-4, "THT Angled Pin Header WR-PHD, Pitch 2.54 mm, Single Row, 3 pins", Color=Black, Contact Resistance=20mΩ, Current Rating=3A, Operating Supply Voltage=250V, Connector Type="Male Pin", Contact Material=Copper, Contact Mating Length=5.9944mm, Contact Plating=Gold, Gender=Male, Lead Pitch=2.54mm, Mount="Through Hole", Number of Contacts=3, Number of Pins=3, Number of Positions=3, Number of Rows=1, Packaging=Bulk, Pitch=2.54mm, RoHS=Compliant, Termination=Solder
P3: library part CMP-1502-01064-4, "THT Vertical Pin Header WR-PHD, Pitch 2.54 mm, Single Row, 4 pins", Color=Black, Contact Resistance=20mΩ, Current Rating=3A, Max Operating Temperature=105°C, Min Operating Temperature=-40°C, Operating Supply Voltage=250V, Connector Type="Male Pin", Contact Material=Gold, Contact Mating Length=5.9944mm, Contact Plating=Gold, Gender=Male, Height=8.89mm, Lead Free="Lead Free", Lead Pitch=2.54mm, Mount="Through Hole", Number of Contacts=4, Number of Pins=4, Number of Positions=4, Number of Rows=1, Orientation=Vertical, Packaging=Bulk, Pitch=2.54mm, RoHS=Compliant, Termination=Solder, Voltage Rating=250V
Q1 Q2: library part CMP-1048-00599-1, "VHF / UHF Transistor, NPN Silicon, 3-Pin SOT-23, Pb-Free, Tape and Reel", Manufacturer="On Semiconductor", ComponentLink1Description="Manufacturer URL", ComponentLink1URL=http://www.onsemi.com/, ComponentLink2Description=Datasheet, ComponentLink2URL=http://www.onsemi.cn/pub_link/Collateral/MMBTH10LT1-D.PDF, ComponentLink3Description="Package Specification", ComponentLink3URL=http://www.onsemi.cn/pub_link/Collateral/318-08.PDF, DatasheetVersion="Rev. 5", fT Min (MHz)=650, Mounting Technology="Surface Mount", PackageDescription="3-Pin Small Outline Transistor, Body 2.92 x 1.3 mm, Pitch 0.95 mm", PackageReference=SOT-23-3-318-08, PackageVersion="Rev. AP, 11/2009", Packing="Tape and Reel", PartNumber=MMBTH10LT3G, Polarity=NPN, RoHS=TRUE
R1A R1B R1C: library part CMP-04015-029754-1, "3kΩ ±1% 0.1W, 1/10W Chip Resistor 0603 (1608 Metric) Moisture Resistant Thin Film / RN73R1JTTD3001F50", Parameter 1=3k
R2A R2B R2C: library part CMP-2000-04568-2, "RES SMD 20K OHM 0.5% 1/10W 0603 / RT0603DRD0720KL", Manufacturer=Yageo, Package=RT0603, Power Rating=0.1W, Resistance=20KΩ, Temperature="-55°C to +155°C", Temperature Coefficient="25 ppm/°C", Temperature Range High=+155°C, Temperature Range Low=-55°C, Tolerance=0.005, Voltage Rating=75V, Automotive=No, Category=Res, ComponentLink2Description=Datasheet, ComponentLink2URL=http://www.yageo.com/documents/recent/PYu-RT_1-to-0.01_RoHS_L_9.pdf, Composition="Thin Film", Device Class L1="Passive Components", Device Class L2=Resistors, Device Class L3="Chip SMD Resistors", Digikey Description="RES SMD 20K OHM 0.5% 1/10W 0603", Footprint Url=http://www.yageo.com/exep/pages/download/literatures/PYu-R_Mount_10.pdf, Height=0.55mm, Ipc Land Pattern Name=RESC16080X45, Lead Free=Yes, Manufacturer Part Number=RT0603DRD0720KL, Octopart=https://octopart.com/rt0603drd0720kl-yageo-1224030, RoHS=TRUE, Series=RT
R3 R5: library part CMP-03412-035478-1, "RES SMD 10K OHM 1% 1/8W 0805", Manufacturer=Yageo, Package=RT0805, Power Rating=0.125W, Resistance=10KΩ, Temperature="-55°C to +155°C", Temperature Coefficient="25 ppm/°C", Temperature Range High=+155°C, Temperature Range Low=-55°C, Tolerance=0.0001, Voltage Rating=150V, Automotive=No, Category=Res, ComponentLink2Description=Datasheet, ComponentLink2URL=http://www.yageo.com/documents/recent/PYu-RT_1-to-0.01_RoHS_L_9.pdf, Composition="Thin Film", Device Class L1="Passive Components", Device Class L2=Resistors, Device Class L3="Chip SMD Resistors", Digikey Description="RES SMD 10K OHM 1% 1/8W 0805", Footprint Url=http://www.yageo.com/exep/pages/download/literatures/PYu-R_Mount_10.pdf, Height=0.6mm, Ipc Land Pattern Name=RESC200125X50, Lead Free=Yes, Manufacturer Part Number=RT0805FRD0710KL, Octopart=https://octopart.com/rt0805frd0710kl-yageo-71399701, RoHS=TRUE, Series=RT
R4A R4B R4C: library part CMP-04015-089147-1, "10kΩ ±1% 0.1W Chip Resistor 0603 Thick Film AEC-Q200 Qualified / RK73H1JLTDD1002F", Case Code (Imperial)=0603, Case Code (Metric)=1608, Max Operating Temperature=155°C, Min Operating Temperature=-55°C, Power Rating=100mW, Resistance=10kR, Resistor Type="Thick Film", Temperature Coefficient=100ppm/°C, Tolerance=1%, Voltage Rating=50V, Case/Package=0603, Construction=Rectangular, Depth=0.8mm, Lead Free="Contains Lead", Length=1.6mm, Military Standard=Not, Packaging="Tape and Reel", RoHS Compliant=No, Series=RK73H, Termination=SMD/SMT
R6 R7 R12: library part CMP-03412-037267-1, "RES SMD 470 OHM 1% 1/8W 0805", Manufacturer=Yageo, Package=AC0805, Power Rating=1/8W, Resistance=470Ω, Temperature="-55°C to +155°C", Temperature Range High=+155°C, Temperature Range Low=-55°C, Tolerance=0.01, Voltage Rating=150V, Automotive=Yes, Automotive Grade="Grade 0", Category=Res, ComponentLink2Description=Datasheet, ComponentLink2URL=http://www.yageo.com/documents/recent/PYu-AC_51_RoHS_L_6.pdf, Composition="Thick Film", Device Class L1="Passive Components", Device Class L2=Resistors, Device Class L3="Chip SMD Resistors", Digikey Description="RES SMD 470 OHM 1% 1/8W 0805", Footprint Url=http://www.yageo.com/exep/pages/download/literatures/PYu-R_Mount_10.pdf, Height=0.6mm, Ipc Land Pattern Name=RESC200125X50, Lead Free=Yes, Manufacturer Part Number=AC0805FR-07470RL, Mouser Description="Thick Film Resistors 1/8W 470ohm 1% AEC-Q200", Octopart=https://octopart.com/ac0805fr-07470rl-yageo-26633242, RoHS=TRUE, Series=AC
R8: library part CMP-03211-010976-1, "Res Thin Film 1206 1.0KΩ 0.1% 0.25W 15ppm/°C Molded SMD", Manufacturer="TE Connectivity", Package=RP732B, Power Rating=0.25W, Resistance=1.0KΩ, Temperature="-55°C to 155°C", Temperature Coefficient=15ppm/°C, Temperature Range High=155°C, Temperature Range Low=-55°C, Tolerance=0.1%, Voltage Rating=200V, Automotive=No, Category=Res, ComponentLink2Description=Datasheet, ComponentLink2URL=https://www.te.com/commerce/DocumentDelivery/DDEController?Action=showdoc&DocId=Data+Sheet%7F1773272%7FL%7Fpdf%7FEnglish%7FENG_DS_1773272_L.pdf%7F8-1879255-6, Composition="Thin Film", Device Class L1="Passive Components", Device Class L2=Resistors, Device Class L3="Chip SMD Resistors", Height=0.65mm, Ipc Land Pattern Name=RESC305155X55, Lead Free=Yes, Manufacturer Part Number=RP73D2B1K0BTDF, Octopart=https://octopart.com/rp73d2b1k0btdf-te+connectivity-22741139, octopart_url=https://octopart.com/rp73d2b1k0btdf-te+connectivity-22741139, Packaging="1000 Reel", RoHS=TRUE, Series=RP73
R9 R10: library part CMP-02407-000039-1, "RES SMD 10K OHM 0.1% 1/5W 0805", Manufacturer=Vishay, Package=PATT0805, Power Rating=200mW, Resistance=10kΩ, Temperature="-55°C to +250°C", Temperature Coefficient=25ppm/°C, Temperature Range High=+250°C, Temperature Range Low=-55°C, Tolerance=0.1%, Voltage Rating=100V, Automotive=Yes, Automotive Grade="Grade 0", Category=Res, ComponentLink2Description=Datasheet, ComponentLink2URL=http://www.vishay.com/docs/60124/patt.pdf, Composition="Thin Film", Device Class L1="Passive Components", Device Class L2=Resistors, Device Class L3="Chip SMD Resistors", Digikey Description="RES SMD 10K OHM 0.1% 1/5W 0805", Footprint Url=http://www.vishay.com/docs/60119/landpatterns.pdf, Height=0.018inch, Ipc Land Pattern Name=RESC203127X38, Lead Free=Yes, Manufacturer Part Number=PATT0805E1002BGT1, Octopart=https://octopart.com/patt0805e1002bgt1-vishay-34963131, RoHS=TRUE, Series=PATT
R11: "1.6 kOhms Â±1% 0.75W, 3/4W Chip Resistor 2010 (5025 Metric) Automotive AEC-Q200 Thick Film", Package="5025 Vishay", Check_prices=https://www.snapeda.com/parts/CRCW20101K60FKEF/Vishay/view-part/?ref=eda, MF=Vishay, MP=CRCW20101K60FKEF, SnapEDA_Link=https://www.snapeda.com/parts/CRCW20101K60FKEF/Vishay/view-part/?ref=snap
R13: library part CMP-04015-002277-1, "22.1kΩ ±0.1% 0.1W, 1/10W Chip Resistor 0805 (2012 Metric) Moisture Resistant Thin Film", Case Code (Imperial)=0805, Case Code (Metric)=2012, Max Operating Temperature=125°C, Min Operating Temperature=-55°C, Power Rating=100mW, Resistance=22.1kR, Temperature Coefficient=25ppm/°C, Tolerance=0.1%, Voltage Rating=100V, Case/Package=0805, Composition="Thin Film", Height=0.5mm, Length=2mm, Packaging="Tape and Reel", Termination=SMD/SMT, Voltage Rating (DC)=100V, Weight=0.000194oz, Width=1.2mm
R14: library part CMP-2002-06222-1, "MC00625W0402147K5", Manufacturer=Multicomp, Part Number=MC00625W0402147K5
R15 R16: library part CMP-03412-043833-1, "RES 5.1kΩ 5.00% 0.1W 0603", Case Code (Imperial)=0603, Case Code (Metric)=1608, Max Operating Temperature=155°C, Max Power Dissipation=100mW, Min Operating Temperature=-55°C, Resistance=5.1kR, Resistor Type="Thick Film", Temperature Coefficient=100ppm/°C, Tolerance=5%, Voltage Rating=50V, Case/Package=0603, Features="Moisture Resistant", Height=0.022inch, Lead Free="Lead Free", Length=0.063inch, Number of Terminations=2, Packaging="Tape and Reel", Power Rating=100mW, RoHS Compliant=Yes, Series=AC, Size Code=0603, Termination=SMD/SMT, Weight=7.1E-05oz, Width=0.8mm
R17: library part CMP-2100-03668-5, "RES 100K OHM 1% 1/8W 0805", Case Code (Imperial)=0805, Case Code (Metric)=2012, Max Operating Temperature=155°C, Max Power Dissipation=125mW, Min Operating Temperature=-55°C, Package Quantity=1, Resistance=100kR, Resistance Tolerance=1%, Resistor Type="Thick Film", Temperature Coefficient=100ppm/°C, Voltage Rating=150V, Case/Package=0805, Construction=Rectangular, Depth=1.25mm, Features="Moisture Resistant", Height=0.024inch, Lead Free="Lead Free", Lead Pitch=0.4mm, Length=0.079inch, Military Standard=Not, Number of Pins=2, Number of Terminations=2, Packaging="Tape and Reel", Power Rating=125mW, RoHS Compliant=Yes, Series=RC, Size Code=0805, Technology="THICK FILM", Termination=SMD/SMT, Tolerance=1%, Voltage Rating (DC)=150V, Width=0.049inch
U1: library part CMP-12757-000001-1, "IC REG BUCK 5V 2A TSOT26", Ambient Temperature Range High=+85°C, Ambient Temperature Range Low=-40°C, Manufacturer="Diodes Inc.", Max Junction Temp=+160°C, Max Supply Voltage=32V, Min Supply Voltage=3.8V, Nominal Supply Current=22uA, Output Current=2A, Output Voltage=5V, Package=TSOT26, Switching Frequency=1100kHz, Temperature="-40°C to +85°C", Automotive=No, Category=IC, ComponentLink2Description=Datasheet, ComponentLink2URL=https://www.diodes.com/assets/Datasheets/AP63200-AP63201-AP63203-AP63205.pdf, Device Class L1="Integrated Circuits (ICs)", Device Class L2="Power Management ICs", Device Class L3="Voltage Regulators - Switching", Digikey Description="IC REG BUCK 5V 2A TSOT26", Footprint Url=https://www.diodes.com/assets/Package-Files/TSOT26.pdf, Height=1mm, Lead Free=Yes, Manufacturer Part Number=AP63205WU-7, Max Duty Cycle=100%, Number of Outputs=1, Octopart=https://octopart.com/ap63205wu-7-diodes+inc.-98099551, Output Type=Fixed, RoHS=TRUE, Standoff Height=0.01mm, Switching Topology=Buck, Temperature Range High=+85°C, Temperature Range Low=-40°C